# Altium PCB CH32V4x7V-R0.PcbDoc (part 3 of 3)
Units mm, origin at the board's own origin, x right, y up, seen from the top; angles counter-clockwise.
Board outline 106.4 x 69.09 mm, 2 copper layers (Top Layer, Bottom Layer); 78 components, 117 nets, 431 pads, 740 vias.
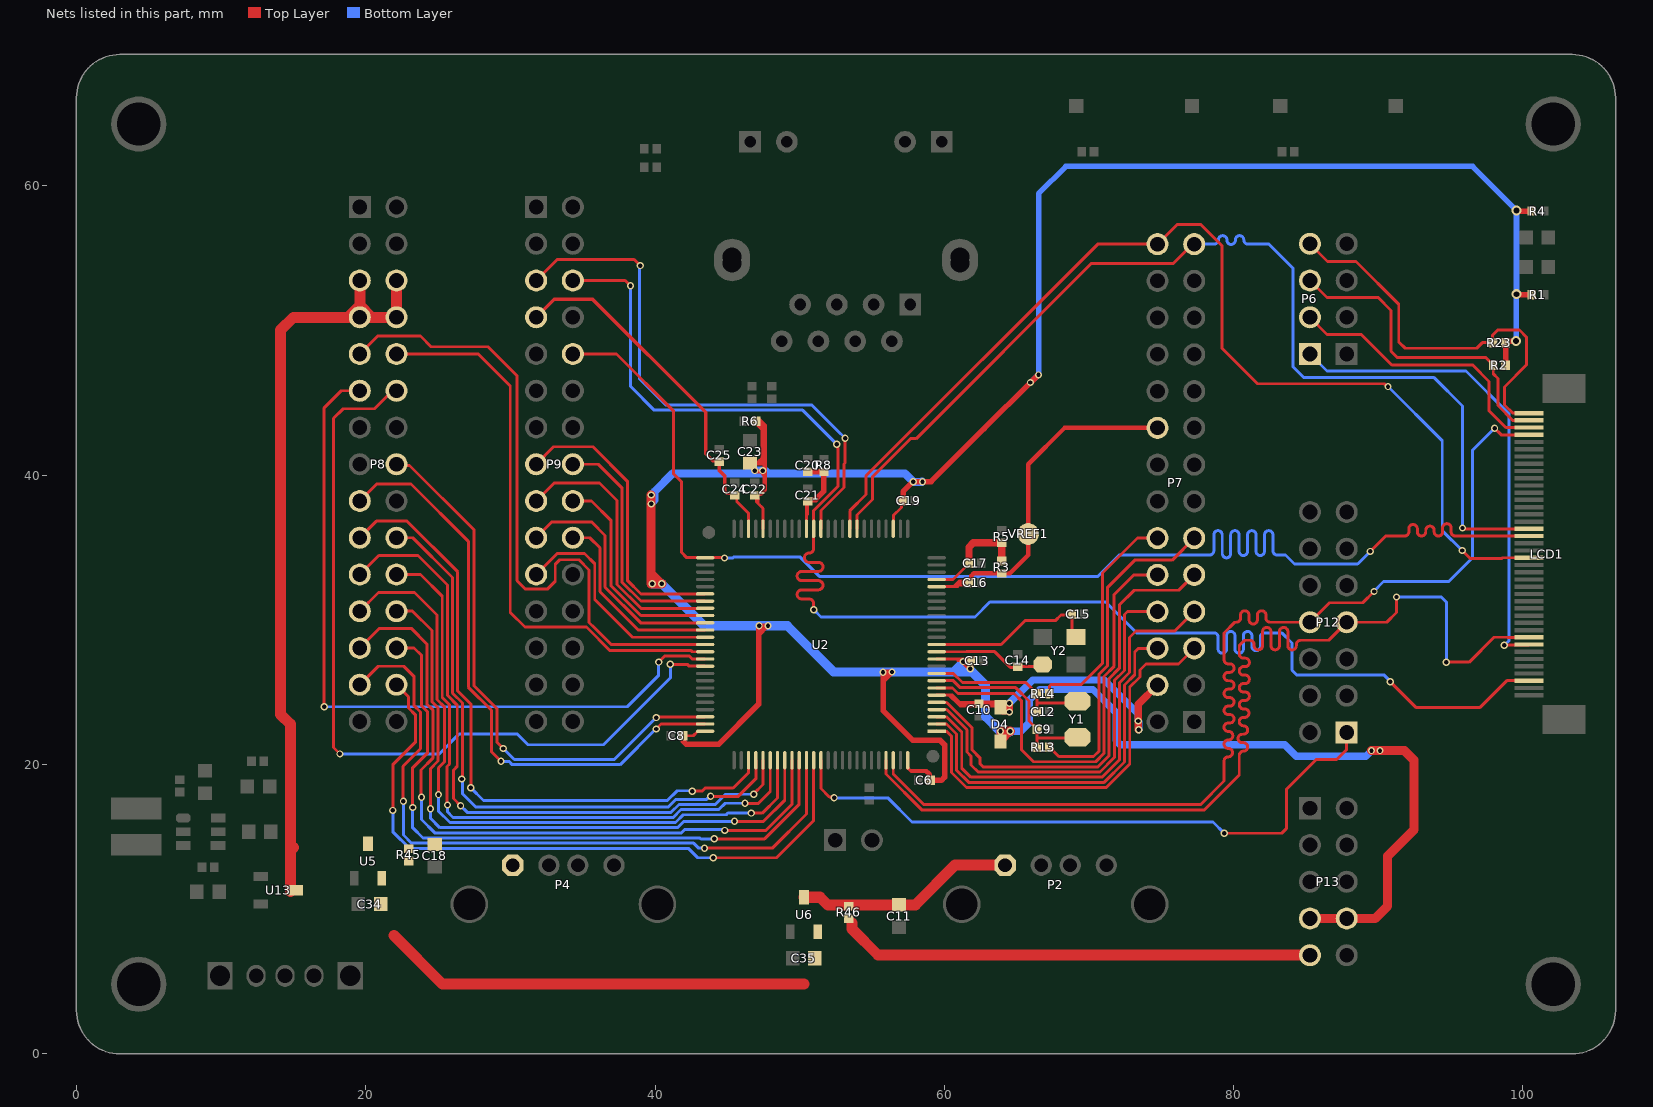
[diagram p3: the nets of this part, all layers, seen from the top]

## Via types
v1: diameter 0.5, hole 0.3, Top Layer to Bottom Layer, tented both sides, 735 vias
v2: diameter 0.7, hole 0.4, Top Layer to Bottom Layer, tented both sides, 5 vias

## Nets (pads, with @x,y where several pads share a name; then routed paths per layer and width w, separated by ;. In a path a pad name is that pad's centre, name@x,y a point inside that pad or via, vN(x,y) a via of type N, cw(c..) or ccw(c..) an arc to the next point about the centre after c; other vN are vias at no path point) (continued)
PC4: LCD1.24 P7.27 U2.33 | length 74.7
  Top Layer w0.203: U2.33@53.964,36.298 53.964,37.248 55.034,38.318 55.034,39.901 57.662,42.529 58.053,42.529 70.173,54.65 75.833,54.65 P7.27@77.319,56.137 ; v1(95.82,36.355) 95.877,36.298 96.082,36.298 96.087,36.293 100.426,36.293 LCD1.24@100.428,36.295
  Bottom Layer w0.203: P7.27@77.272,55.975 78.553,55.975 78.655,55.975 ccw(c78.655,56.267) 78.947,56.267 ; 78.947,56.268 cw(c79.239,56.268) 79.531,56.268 79.531,56.248 ccw(c79.823,56.248) 80.115,56.248 80.115,56.268 cw(c80.408,56.268) 80.7,56.268 ; 80.7,56.267 ccw(c80.992,56.267) 80.992,55.975 81.856,55.975 82.44,55.975 84.101,54.314 84.101,47.501 84.859,46.743 93.863,46.743 95.82,44.786 v1(95.82,36.355)
PC5: LCD1.20 P7.28 U2.34 | length 74.5
  Top Layer w0.203: U2.34@53.464,36.298 53.464,37.543 54.591,38.67 54.591,39.961 70.605,55.975 P7.28@74.732,55.975 74.743,55.975 76.101,57.332 77.723,57.332 79.193,55.863 79.193,48.772 81.64,46.325 90.406,46.325 90.603,46.128 v1(90.674,46.128) ; v1(95.796,34.792) 96.347,34.241 98.554,34.241 98.608,34.295 LCD1.20@100.428,34.295
  Bottom Layer w0.203: v1(90.674,46.128) 94.421,42.382 94.421,36.167 v1(95.796,34.792)
PC6: P8.9 U2.63 | length 46
  Top Layer w0.203: P8.9@19.588,48.38 20.828,49.62 23.776,49.62 24.515,48.881 28.449,48.881 30.452,46.878 30.452,32.713 31.041,32.124 32.554,32.124 33.102,32.672 33.102,33.847 33.411,34.156 34.741,34.156 35.44,33.458 35.44,29.826 35.834,29.432 36.967,28.298 U2.63@43.464,28.298
PC7: P8.10 U2.64 | length 39
  Top Layer w0.203: P8.10@22.128,48.38 27.779,48.38 29.99,46.169 29.99,30.514 31,29.505 35.258,29.505 36.889,27.873 42.495,27.873 42.57,27.798 U2.64@43.464,27.798
PC8: P8.11 U2.65 | length 52
  Top Layer w0.203: v1(17.126,23.989) 17.126,44.66 18.306,45.84 P8.11@19.588,45.84 ; v1(40.251,27.08) 40.689,27.518 42.347,27.518 42.567,27.298 U2.65@43.464,27.298
  Bottom Layer w0.203: v1(17.126,23.989) 17.133,23.996 38.081,23.996 40.251,26.166 v1(40.251,27.08)
PC9: P8.12 U2.66 | length 57.6
  Top Layer w0.203: v1(18.214,20.737) 17.779,21.172 17.779,43.933 18.44,44.595 20.612,44.595 21.857,45.84 P8.12@22.128,45.84 ; v1(41.058,26.93) 42.231,26.93 42.363,26.798 U2.66@43.464,26.798
  Bottom Layer w0.203: v1(18.214,20.737) 25.08,20.737 26.468,22.125 30.464,22.125 31.219,21.37 36.438,21.37 41.058,25.991 v1(41.058,26.93)
PC10: P8.19 U2.78 | length 45.3
  Top Layer w0.203: P8.19@19.588,35.68 20.731,36.822 22.854,36.822 26.355,33.321 26.355,25.078 27.291,24.143 27.291,18.419 v1(27.261,18.389) ; v1(42.578,18.156) 43.236,18.156 43.359,18.279 43.364,18.279 43.458,18.373 45.403,18.373 46.464,19.434 U2.78@46.464,20.298
  Bottom Layer w0.203: v1(27.261,18.389) 28.143,17.507 40.849,17.507 41.53,18.187 42.547,18.187 v1(42.578,18.156)
PC11: P8.20 U2.79 | length 43
  Top Layer w0.203: P8.20@22.128,35.68 23.251,35.68 26,32.931 26,24.931 26.68,24.251 26.68,19.035 v1(26.642,18.997) ; v1(43.839,17.816) 43.85,17.804 45.757,17.804 46.964,19.012 U2.79@46.964,20.298
  Bottom Layer w0.203: v1(26.642,18.997) 26.68,18.959 26.68,17.982 27.586,17.076 40.922,17.076 41.443,17.597 43.572,17.597 43.79,17.816 v1(43.839,17.816)
PC12: P8.21 U2.80 | length 46.9
  Top Layer w0.203: P8.21@19.588,33.14 20.903,34.455 23.607,34.455 25.644,32.418 25.644,24.784 26.324,24.104 26.324,19.875 26.06,19.611 26.06,17.656 v1(26.557,17.159) ; v1(46.826,17.947) 46.826,17.975 47.464,18.614 U2.80@47.464,20.298
  Bottom Layer w0.203: v1(26.557,17.159) 27.016,16.7 41.111,16.7 41.653,17.242 44.163,17.242 44.868,17.947 v1(46.826,17.947)
PC13: P7.10 U2.7 | length 30.7
  Top Layer w0.203: U2.7@59.464,25.298 60.562,25.298 60.945,24.915 64.809,24.915 65.346,24.379 65.346,21 66.153,20.193 70.458,20.193 71.038,20.773 71.038,26.096 71.74,26.797 71.74,31.751 73.104,33.115 P7.10@74.732,33.115
PC14: P7.11 R13.1 | length 22.8
  Top Layer w0.203: R13.1@67.254,21.207 67.254,21.182 67.452,20.983 67.477,20.983 67.912,20.548 70.31,20.548 70.683,20.921 70.683,26.243 71.291,26.851 71.291,32.26 73.161,34.131 75.748,34.131 P7.11@77.272,35.655
PC15: P7.12 R14.1 | length 15.9
  Top Layer w0.203: R14.1@67.254,24.89 67.254,25.401 67.378,25.526 69.463,25.526 70.935,26.998 70.935,33.244 73.346,35.655 P7.12@74.732,35.655
PD0: P8.22 U2.81 | length 44.4
  Top Layer w0.203: P8.22@22.128,33.14 23.781,33.14 25.288,31.632 25.288,24.637 25.786,24.139 25.786,20.026 25.624,19.865 25.624,17.229 v1(25.653,17.2) ; v1(46.213,17.326) 46.234,17.306 47.14,17.306 47.964,18.13 U2.81@47.964,20.298
  Bottom Layer w0.203: v1(25.653,17.2) 25.653,16.732 26.04,16.345 41.259,16.345 41.8,16.886 44.409,16.886 44.849,17.326 v1(46.213,17.326)
PD1: P8.23 U2.82 | length 47.5
  Top Layer w0.203: P8.23@19.588,30.6 20.88,31.892 23.378,31.892 24.933,30.337 24.933,24.489 25.43,23.992 25.43,20.173 25.028,19.771 v1(25.028,17.924) ; v1(46.651,16.642) 46.656,16.638 47.407,16.638 48.464,17.695 U2.82@48.464,20.298
  Bottom Layer w0.203: v1(25.028,17.924) 25.039,17.913 25.039,16.772 25.822,15.989 41.406,15.989 41.948,16.531 44.92,16.531 45.031,16.642 v1(46.651,16.642)
PD2: P8.24 U2.83 | length 44.7
  Top Layer w0.203: P8.24@22.128,30.6 23.235,30.6 24.577,29.258 24.577,24.342 24.99,23.929 24.99,20.236 24.467,19.713 24.467,17.32 24.471,17.316 v1(24.471,16.939) ; v1(45.494,16.074) 47.506,16.074 48.964,17.533 U2.83@48.964,20.298
  Bottom Layer w0.203: v1(24.471,16.939) 24.471,16.283 25.121,15.633 41.553,15.633 41.994,16.074 v1(45.494,16.074)
PD3: P8.25 U2.84 | length 48.2
  Top Layer w0.203: P8.25@19.588,28.06 20.944,29.416 23.147,29.416 24.222,28.341 24.222,24.195 24.635,23.782 24.635,20.44 23.815,19.62 23.815,17.772 v1(23.852,17.735) ; v1(44.814,15.448) 47.658,15.448 49.464,17.254 U2.84@49.464,20.298
  Bottom Layer w0.203: v1(23.852,17.735) 23.852,16.197 24.772,15.278 41.824,15.278 42.05,15.504 44.758,15.504 v1(44.814,15.448)
PD4: P8.26 U2.85 | length 45.5
  Top Layer w0.203: P8.26@22.128,28.06 23.335,28.06 23.866,27.529 23.866,24.047 24.279,23.634 24.279,20.817 23.244,19.782 v1(23.244,17.036) ; v1(44.09,14.867) 47.58,14.867 49.964,17.251 U2.85@49.964,20.298
  Bottom Layer w0.203: v1(23.244,17.036) 23.244,15.631 23.953,14.922 43.106,14.922 43.161,14.867 v1(44.09,14.867)
PD5: P8.27 U2.86 | length 49.2
  Top Layer w0.203: P8.27@19.588,25.52 20.865,26.797 22.626,26.797 23.346,26.076 23.346,24.064 23.783,23.627 23.783,21.096 22.568,19.88 22.568,17.49 v1(22.602,17.455) ; v1(43.414,14.22) 48.104,14.22 50.464,16.58 U2.86@50.464,20.298
  Bottom Layer w0.203: v1(22.602,17.455) 22.602,15.129 23.165,14.567 42.672,14.567 43.018,14.22 v1(43.414,14.22)
PD6: P8.28 U2.87 | length 46.4
  Top Layer w0.203: v1(21.871,16.83) 21.871,19.985 23.428,21.542 23.428,23.447 22.965,23.91 22.965,24.684 P8.28@22.128,25.52 ; v1(44.019,13.555) 48.397,13.555 50.964,16.123 U2.87@50.964,20.298
  Bottom Layer w0.203: v1(21.871,16.83) 21.871,15.356 23.015,14.211 42.296,14.211 42.951,13.555 v1(44.019,13.555)
PD7: P12.1 U2.88 | length 44.8
  Top Layer w0.203: U2.88@51.464,20.298 51.464,18.336 52.048,17.752 52.324,17.752 v1(52.379,17.697) ; v1(79.348,15.251) 83.325,15.251 83.639,15.565 83.639,18.277 85.702,20.341 87.122,20.341 87.813,21.031 P12.1@87.813,22.218
  Bottom Layer w0.203: v1(52.379,17.697) 56.093,17.697 57.755,16.035 78.564,16.035 v1(79.348,15.251)
PD8: LCD1.23 P9.10 U2.51 | length 94.8
  Top Layer w0.203: P9.10@34.32,48.38 37.338,48.38 41.29,44.428 41.29,40.08 41.839,39.531 41.839,34.65 42.186,34.303 43.46,34.303 U2.51@43.464,34.298 44.783,34.298 v1(44.805,34.276) ; v1(89.444,34.734) 90.511,35.8 91.715,35.8 91.817,35.8 ccw(c91.817,36.092) 92.109,36.092 92.109,36.303 cw(c92.401,36.303) 92.693,36.303 92.693,36.092 ccw(c92.985,36.092) 93.277,36.092 93.277,36.191 cw(c93.569,36.191) 93.861,36.191 93.861,36.092 ccw(c94.153,36.092) 94.445,36.092 94.445,36.359 cw(c94.738,36.359) 95.03,36.359 95.03,36.092 ccw(c95.322,36.092) 95.322,35.8 96.026,35.8 100.423,35.8 LCD1.23@100.428,35.795
  Bottom Layer w0.203: v1(44.805,34.276) 45.38,34.276 45.461,34.357 50.009,34.357 51.353,33.014 70.619,33.014 72.092,34.486 78.232,34.486 78.334,34.486 ccw(c78.334,34.778) 78.626,34.778 78.626,35.878 cw(c78.918,35.878) 79.21,35.878 79.21,34.583 ccw(c79.502,34.583) 79.794,34.583 79.794,35.878 cw(c80.086,35.878) 80.378,35.878 80.378,34.743 ccw(c80.671,34.743) 80.963,34.743 80.963,35.878 cw(c81.255,35.878) 81.547,35.878 81.547,34.743 ccw(c81.839,34.743) 82.131,34.743 82.131,35.878 cw(c82.423,35.878) 82.715,35.878 82.715,34.778 ccw(c83.007,34.778) 83.007,34.486 83.586,34.486 84.21,33.862 84.376,33.862 88.573,33.862 v1(89.444,34.734)
PD9: P9.15 U2.56 | length 20.4
  Top Layer w0.203: P9.15@31.78,40.76 32.989,41.968 35.703,41.968 38.084,39.588 38.084,32.739 39.025,31.798 U2.56@43.464,31.798
PD10: P9.16 U2.57 | length 16.9
  Top Layer w0.203: P9.16@34.32,40.76 36.07,40.76 37.728,39.102 37.728,32.592 39.022,31.298 U2.57@43.464,31.298
PD11: P9.17 U2.58 | length 19.2
  Top Layer w0.203: P9.17@31.78,38.22 33.029,39.468 36.152,39.468 37.372,38.248 37.372,32.444 39.019,30.798 U2.58@43.464,30.798
PD12: P9.18 U2.59 | length 15.1
  Top Layer w0.203: P9.18@34.32,38.22 35.614,38.22 36.942,36.892 36.942,32.372 39.016,30.298 U2.59@43.464,30.298
PD13: P9.19 U2.60 | length 17.1
  Top Layer w0.203: P9.19@31.78,35.68 32.859,36.758 35.622,36.758 36.548,35.831 36.548,32.263 39.013,29.798 U2.60@43.464,29.798
PD14: P9.20 U2.61 | length 13.6
  Top Layer w0.203: P9.20@34.32,35.68 35.484,35.68 36.185,34.979 36.185,31.95 38.837,29.298 U2.61@43.464,29.298
PD15: P9.21 U2.62 | length 16.1
  Top Layer w0.203: P9.21@31.78,33.14 33.235,34.594 35.124,34.594 35.829,33.889 35.829,31.418 38.449,28.798 U2.62@43.464,28.798
PE0: LCD1.9 P12.7 U2.97 | length 74.5
  Top Layer w0.203: U2.97@55.964,20.298 55.964,19.346 58.438,16.873 77.979,16.873 80.385,19.279 80.385,19.338 80.385,20.634 cw(c80.677,20.634) 80.677,20.926 ccw(c80.677,21.218) 80.677,21.51 80.594,21.51 cw(c80.594,21.802) 80.594,22.094 80.677,22.094 ccw(c80.677,22.386) 80.677,22.678 cw(c80.677,22.971) 80.677,23.263 80.766,23.263 ccw(c80.766,23.555) 80.766,23.847 80.677,23.847 cw(c80.677,24.139) 80.677,24.431 80.793,24.431 ccw(c80.793,24.723) 80.793,25.015 80.677,25.015 cw(c80.677,25.307) 80.677,25.599 80.793,25.599 ccw(c80.793,25.892) 80.793,26.184 80.677,26.184 cw(c80.677,26.476) 80.677,26.768 80.793,26.768 ccw(c80.793,27.06) 80.793,27.352 80.677,27.352 cw(c80.677,27.644) 80.385,27.644 80.385,27.746 80.385,28.218 80.513,28.345 80.759,28.591 81.118,28.591 cw(c81.118,28.299) 81.41,28.299 81.41,28.22 ccw(c81.702,28.22) 81.994,28.22 81.994,29.19 cw(c82.286,29.19) 82.579,29.19 82.579,28.22 ccw(c82.871,28.22) 83.163,28.22 83.163,29.19 cw(c83.455,29.19) 83.747,29.19 83.747,28.22 ccw(c84.039,28.22) 84.331,28.22 84.331,28.299 cw(c84.623,28.299) 84.623,28.591 84.725,28.591 86.566,28.591 P12.7@87.813,29.838 90.577,29.838 91.255,30.516 v1(91.255,31.58) ; v1(94.693,27.077) 96.279,27.077 98.002,28.8 98.94,28.8 98.945,28.795 LCD1.9@100.428,28.795
  Bottom Layer w0.203: v1(91.255,31.58) 94.357,31.58 94.712,31.225 94.712,27.096 v1(94.693,27.077)
PE1: LCD1.37 P12.8 U2.98 | length 74.5
  Top Layer w0.203: U2.98@56.464,20.298 56.464,19.349 58.585,17.228 77.707,17.228 79.333,18.855 79.333,19.589 79.333,20.243 cw(c79.626,20.243) 79.626,20.535 ccw(c79.626,20.827) 79.626,21.12 cw(c79.626,21.412) 79.626,21.704 79.654,21.704 ccw(c79.654,21.996) 79.654,22.288 79.626,22.288 cw(c79.626,22.58) 79.626,22.872 79.737,22.872 ccw(c79.737,23.164) 79.737,23.456 79.626,23.456 cw(c79.626,23.748) 79.626,24.041 79.737,24.041 ccw(c79.737,24.333) 79.737,24.625 79.626,24.625 cw(c79.626,24.917) 79.626,25.209 79.737,25.209 ccw(c79.737,25.501) 79.737,25.793 79.626,25.793 cw(c79.626,26.085) 79.626,26.377 79.737,26.377 ccw(c79.737,26.669) 79.737,26.962 79.626,26.962 cw(c79.626,27.254) 79.333,27.254 79.333,27.355 79.333,29.09 80.081,29.838 80.183,29.838 ccw(c80.183,30.13) 80.475,30.13 80.475,30.342 cw(c80.767,30.342) 81.059,30.342 81.059,30.007 ccw(c81.351,30.007) 81.643,30.007 81.643,30.342 cw(c81.935,30.342) 82.227,30.342 82.227,30.13 ccw(c82.519,30.13) 82.519,29.838 83.802,29.838 P12.8@85.273,29.838 86.62,31.185 88.927,31.185 v1(89.709,31.967) ; v1(98.037,43.255) 98.496,42.795 LCD1.37@100.428,42.795
  Bottom Layer w0.203: v1@89.696,31.981 90.362,32.647 94.869,32.647 96.513,34.291 96.513,41.731 v1(98.037,43.255)
PE2: P7.5 U2.1 | length 28.3
  Top Layer w0.203: U2.1@59.464,22.311 59.452,22.311 U2.1@59.464,22.298 60.15,22.298 60.49,21.958 60.49,19.457 61.532,18.415 71.194,18.415 72.816,20.037 72.816,25.359 73.518,26.061 73.518,26.535 73.93,26.947 76.185,26.947 P7.5@77.272,28.035
PE3: P7.6 U2.2 | length 26.3
  Top Layer w0.203: U2.2@59.464,22.798 60.153,22.798 60.845,22.105 60.845,19.604 61.68,18.77 71.047,18.77 72.461,20.184 72.461,25.506 73.163,26.208 73.163,27.779 73.418,28.035 P7.6@74.732,28.035
PE4: P7.7 U2.3 | length 30.3
  Top Layer w0.203: U2.3@59.464,23.298 60.155,23.298 61.201,22.253 61.201,19.752 61.827,19.126 70.9,19.126 72.105,20.331 72.105,25.654 72.807,26.355 72.807,28.784 73.253,29.23 75.928,29.23 P7.7@77.272,30.575
PE5: P7.8 U2.4 | length 28.3
  Top Layer w0.203: U2.4@59.464,23.798 60.158,23.798 61.557,22.4 61.557,20.868 61.849,20.575 61.849,19.973 62.341,19.481 70.752,19.481 71.75,20.479 71.75,25.801 72.451,26.503 72.451,30.371 72.655,30.575 P7.8@74.732,30.575
PE6: P7.9 U2.5 | length 32
  Top Layer w0.203: U2.5@59.464,24.298 60.161,24.298 61.912,22.547 61.912,21.015 62.453,20.475 62.453,20.072 62.688,19.837 70.605,19.837 71.394,20.626 71.394,25.948 72.096,26.65 72.096,31.025 73.12,32.049 76.207,32.049 P7.9@77.272,33.115
PE8: P9.5 U2.38 | length 38.7
  Top Layer w0.203: P9.5@31.78,53.46 33.233,54.913 38.555,54.913 v1(38.978,54.49) ; U2.38@51.464,36.298 51.464,37.554 53.065,39.155 53.065,40.782 53.137,40.854 v1(53.137,42.561)
  Bottom Layer w0.203: v1(38.978,54.49) 38.935,54.447 38.935,46.653 40.733,44.855 50.835,44.855 52.84,42.85 52.848,42.85 v1(53.137,42.561)
PE9: LCD1.3 P9.6 U2.39 | length 107.9
  Top Layer w0.203: P9.6@34.32,53.46 37.932,53.46 v1(38.298,53.094) ; v1(50.964,30.704) 50.964,31.023 50.964,31.125 ccw(c50.647,31.125) 50.647,31.442 50.139,31.442 cw(c50.139,31.76) 50.139,32.077 51.291,32.077 ccw(c51.291,32.395) 51.291,32.712 50.139,32.712 cw(c50.139,33.03) 50.139,33.347 51.291,33.347 ccw(c51.291,33.665) 51.291,33.982 50.641,33.982 cw(c50.641,34.3) 50.641,34.617 50.647,34.617 ccw(c50.647,34.935) 50.964,34.935 50.964,35.903 U2.39@50.964,36.298 50.964,37.557 52.646,39.239 52.646,41.869 52.623,41.892 52.623,42.08 v1(52.566,42.137) ; v1(90.824,25.722) 92.591,23.956 97.042,23.956 98.882,25.795 LCD1.3@100.401,25.795
  Bottom Layer w0.203: v1(38.298,53.094) 38.298,46.146 39.945,44.499 50.204,44.499 v1(52.566,42.137) ; v1(50.964,30.704) 51.463,30.205 62.114,30.205 63.144,31.236 71.153,31.236 73.28,29.109 77.943,29.109 78.629,29.109 cw(c78.629,28.816) 78.921,28.816 78.921,27.989 ccw(c79.213,27.989) 79.505,27.989 79.505,28.911 cw(c79.797,28.911) 80.089,28.911 80.089,27.989 ccw(c80.381,27.989) 80.673,27.989 80.673,28.911 cw(c80.965,28.911) 81.258,28.911 81.258,28.166 ccw(c81.55,28.166) 81.842,28.166 81.842,28.816 cw(c82.134,28.816) 82.134,29.109 83.1,29.109 83.32,29.109 84.024,28.404 84.024,26.526 84.346,26.204 90.377,26.204 90.824,25.757 v1(90.824,25.722)
PE10: P8.16 U2.73 | length 38.7
  Top Layer w0.203: P8.16@22.128,40.76 22.209,40.68 23.033,40.68 27.469,36.243 27.469,25.473 29.061,23.881 29.061,21.561 v1(29.513,21.109) ; v1(40.086,23.243) 40.136,23.293 43.46,23.293 U2.73@43.464,23.298
  Bottom Layer w0.203: v1(29.513,21.109) 30.273,20.349 37.186,20.349 40.08,23.243 v1(40.086,23.243)
PE11: P8.17 U2.74 | length 41.1
  Top Layer w0.203: P8.17@19.588,38.22 20.759,39.39 23.135,39.39 27.092,35.433 27.092,25.347 28.691,23.748 28.691,20.884 v1(29.351,20.224) ; v1(40.08,22.459) 40.419,22.798 U2.74@43.464,22.798
  Bottom Layer w0.203: v1(29.351,20.224) 29.895,20.224 30.126,19.994 37.587,19.994 40.052,22.459 v1(40.08,22.459)
TOUCH_INT: LCD1.38 P6.2 | length 19.5
  Top Layer w0.203: P6.2@85.273,50.92 86.459,49.734 88.818,49.734 90.933,47.619 96.528,47.619 97.658,46.489 97.658,44.452 98.814,43.295 LCD1.38@100.428,43.295
TOUCH_RST: LCD1.8 P6.1 | length 33.3
  Top Layer w0.203: v1(98.71,28.245) 98.736,28.27 100.403,28.27 LCD1.8@100.428,28.295
  Bottom Layer w0.203: P6.1@85.273,48.38 86.451,47.202 96.065,47.202 99.046,44.221 99.046,28.581 v1(98.71,28.245)
TOUCH_SCLK: LCD1.39 P6.3 R2.2 | length 22.3
  Top Layer w0.203: P6.3@85.273,53.46 86.455,52.278 89.995,52.278 90.879,51.393 90.879,48.574 91.307,48.146 97.43,48.146 97.942,47.634 97.942,47.016 98.266,46.692 98.266,44.812 99.283,43.795 LCD1.39@100.428,43.795
TOUCH_SDA: LCD1.40 P6.4 R23.2 | length 27.8
  Top Layer w0.203: P6.4@85.273,56 86.488,54.785 88.45,54.785 91.414,51.821 91.414,49.217 91.853,48.777 96.8,48.777 97.188,49.165 97.888,49.165 97.888,49.676 98.255,50.042 99.756,50.042 100.251,49.547 100.251,47.634 98.726,46.108 98.726,44.856 99.286,44.295 LCD1.40@100.428,44.295
VBAT: C10.2 D4.1 P7.4 U2.6 | length 26.2
  Top Layer w0.203: U2.6@59.464,24.798 60.327,24.798 ; C10.2@62.073,24.033 62.068,24.039 61.086,24.039 60.942,24.183 ; C10.2@62.172,24.263 62.155,24.281 61.076,24.281 ; C10.2@62.177,24.033 62.177,24.153 C10.2@62.147,24.183 ; C10.2@62.37,24.183 C10.2@62.147,24.183 ; 60.327,24.798 60.942,24.183 ; 60.327,24.798 60.559,24.798 61.076,24.281 ; 60.942,24.183 61.174,24.183 ; 61.076,24.281 61.174,24.183 ; 61.174,24.183 C10.2@62.147,24.183
  Top Layer w0.508: C10.2@62.37,24.183 63.705,24.183 63.875,24.013 D4.1@63.875,23.953 63.875,23.868 64.036,23.707 64.424,23.707 v1(64.497,23.635) 64.497,24.185 64.036,24.185 63.993,24.142 D4.1@63.993,24.046 ; v1@73.4,22.402 v1(73.4,23.013) 73.4,24.163 P7.4@74.732,25.495
  Bottom Layer w0.508: v1(64.497,23.635) v1(64.497,24.236) 66.105,25.844 71.056,25.844 73.4,23.5 v1(73.4,23.013) 73.436,22.977 v1(73.436,22.402)
VBUS: C34.1 C35.1 P8.5 P8.6 P8.7 P8.8 P13.9 R45.1 R46.1 U5.2 U6.2 U13.3 | length 117.8
  Top Layer w0.762: U13.3@14.783,11.212 14.783,14.025 ; 15.01,14.252 14.783,14.025 ; P8.5@19.588,53.46 19.588,51.735 ; 21.942,8.182 25.311,4.813 50.279,4.813 ; P8.6@22.128,53.46 P8.8@22.128,50.92 20.403,50.92 ; R46.1@53.609,9.062 53.609,8.639 55.429,6.818 P13.9@85.273,6.818 ; 14.783,14.025 14.783,22.805 14.113,23.475 14.113,50.03 15.003,50.92 18.774,50.92 ; 18.774,50.92 19.588,51.735 ; 18.774,50.92 P8.7@19.588,50.92 ; P8.7@19.588,50.92 20.403,50.92 ; P8.7@19.588,50.92 19.588,51.735 ; 19.588,51.735 20.403,50.92
VBUS_P1: C18.1 P4.1 R45.2 U5.3
VBUS_P2: C11.1 P2.1 R46.2 U6.3 | length 15.1
  Top Layer w0.762: U6.3@50.305,10.827 51.4,10.827 51.939,10.287 R46.2@53.397,10.287 ; R46.2@53.495,10.295 C11.1@56.864,10.295 57.987,10.295 60.749,13.056 P2.1@64.117,13.056
VDD: C6.2 C8.1 C13.1 C19.2 C22.2 C23.2 D4.2 P13.7 P13.8 R1.1 R2.1 R4.1 R6.2 R23.1 U2.11 U2.28 U2.46 U2.75 U2.100 | length 246.3
  Top Layer w0.203: C8.1@41.94,21.989 42.635,21.989 42.936,22.29 43.456,22.29 U2.75@43.465,22.298 ; C22.2@46.877,38.594 46.942,38.594 46.963,38.573 47.001,38.535 C22.2@47.009,38.527 ; C22.2@47.009,38.549 C22.2@47.009,38.527 ; 47.259,37.918 47.123,38.054 ; U2.46@47.464,36.298 47.464,37.712 47.123,38.054 ; U2.28@56.464,36.298 56.469,36.303 56.469,37.21 57.031,37.772 57.031,38.257 C19.2@57.148,38.373 ; 58.753,19.468 58.869,19.352 58.869,19.079 C6.2@59.036,18.912 59.036,19.361 58.882,19.516 ; U2.11@59.464,27.298 60.842,27.298 ; v1@61.256,27.123 61.206,27.173 60.967,27.173 60.842,27.298 ; C13.1@61.852,27.168 61.722,27.298 60.842,27.298 ; C22.2@47.009,38.527 47.123,38.413 47.123,38.054 ; C22.2@47.009,38.527 47.009,38.168 47.123,38.054 ; U2.100@57.469,19.772 57.469,20.293 U2.100@57.464,20.298 57.464,19.777 U2.100@57.469,19.772 ; U2.100@57.469,19.772 57.469,19.745 57.623,19.591 ; U2.100@57.469,19.772 57.65,19.591 ; 57.623,19.591 57.65,19.591 ; 57.623,19.591 57.699,19.516 58.882,19.516 ; 57.65,19.591 58.806,19.591 58.882,19.516
  Top Layer w0.305: C22.2@46.95,38.56 47.098,38.708 47.304,38.708 47.58,38.984 47.58,40.005 ; C23.2@46.95,40.823 47.54,40.823 47.58,40.782 ; C22.2@47.001,38.535 C22.2@47.009,38.527 ; R6.2@47.001,43.727 47.001,43.702 47.58,43.123 ; v1@47.013,40.26 47.325,40.26 47.58,40.005 ; R6.2@47.052,43.549 47.43,43.17 ; R6.2@47.166,43.852 47.58,43.437 47.58,43.123 ; 47.211,40.94 47.43,41.159 47.43,43.17 ; 47.23,40.921 47.431,40.921 47.58,41.07 ; 47.43,43.17 47.58,43.02 ; 47.58,40.005 47.58,40.782 ; 47.58,40.782 47.58,41.07 ; 47.58,41.07 47.58,43.02 ; 47.58,43.02 47.58,43.123
  Top Layer w0.381: C8.1@41.94,21.989 41.94,21.619 42.161,21.398 44.396,21.398 47.169,24.171 47.169,29.041 ; v1@47.169,29.48 47.169,29.041 ; v1@47.291,29.551 47.306,29.566 47.784,29.566 v1(47.807,29.589) ; v1@47.656,29.528 47.169,29.041 ; v1(56.376,26.393) v1@56.369,26.387 ; C19.2@57.148,38.373 57.152,38.373 57.152,38.863 v1(57.844,39.555) 59.091,39.555 62.753,43.217 v1(65.949,46.413) 65.952,46.416 65.972,46.416 66.492,46.936 v1(66.511,46.936) ; C6.2@59.036,18.912 59.797,18.912 60.02,19.135 60.02,21.368 59.716,21.672 57.817,21.672 55.759,23.73 55.759,25.777 ; v1@61.326,27.189 61.326,27.095 v1(61.797,26.623) 61.82,26.646 C13.1@61.82,27.135 ; v1@61.481,27.133 61.818,27.133 C13.1@61.82,27.135 ; C13.1@61.852,27.168 C13.1@61.82,27.135 ; R23.1@98.789,49.127 98.792,49.124 R2.1@98.792,47.609 ; R23.1@98.792,49.17 98.898,49.276 v2@99.493,49.276 ; v2(99.545,52.518) 99.578,52.518 99.618,52.477 R1.1@100.613,52.477 ; v2(99.557,58.304) 99.59,58.304 99.631,58.262 100.503,58.262 100.506,58.264 R4.1@100.613,58.264 ; 55.759,25.777 v1@56.369,26.387 ; 55.759,25.777 v1(55.759,26.38) 55.766,26.387 v1@56.369,26.387
  Top Layer w0.635: v1@39.73,32.504 39.73,33.19 ; v1(39.73,38.634) v1(39.73,38.02) 39.73,33.19 ; v1@39.731,32.503 v1(39.808,32.503) v1(40.467,32.503) ; v1@40.382,32.539 39.73,33.19 ; D4.2@63.875,21.593 63.928,21.593 D4.2@63.928,21.731 ; D4.2@63.898,21.711 63.908,21.711 D4.2@63.928,21.731 ; v1(64.558,22.299) v1@64.496,22.299 ; P13.7@85.273,9.358 P13.8@87.813,9.358 89.776,9.358 90.642,10.224 90.642,13.675 92.461,15.495 92.461,20.309 91.808,20.963 v1(90.119,20.963) v1(89.528,20.963) ; D4.2@63.928,21.731 v1@64.496,22.299 ; D4.2@63.928,21.731 63.928,22.299 v1@64.496,22.299
  Bottom Layer w0.381: v1(65.949,46.413) 65.968,46.413 66.492,46.936 v1(66.511,46.936) ; v1@66.522,46.946 66.522,59.469 68.399,61.346 96.515,61.346 v2(99.557,58.304) 99.551,58.298 99.551,52.524 v2(99.545,52.518) 99.535,52.508 99.535,49.261 v2@99.548,49.247
  Bottom Layer w0.508: v1(64.558,22.299) 65.299,22.299 65.877,22.878 65.877,24.464 66.597,25.184 70.274,25.184 71.871,23.587 71.871,21.668 72.169,21.371 83.532,21.371 84.323,20.58 89.145,20.58 v1(89.528,20.963) v1(90.119,20.963)
  Bottom Layer w0.559: v1(39.73,38.02) v1@39.73,38.053 ; v1@58.466,39.555 58.457,39.546 57.853,39.546 v1(57.844,39.555) 57.284,40.115 47.811,40.115 ; v1@39.73,38.053 39.975,38.298 39.975,38.879 ; v1@39.73,38.053 v1(39.73,38.634) 39.975,38.879 ; 39.975,38.879 41.211,40.115 46.285,40.115 ; 46.285,40.115 47.811,40.115 ; 46.285,40.115 46.489,40.318 v1(46.894,40.318) v1(47.448,40.318) 47.608,40.318 47.811,40.115
  Bottom Layer w0.635: v1@39.831,32.484 39.85,32.503 v1(40.467,32.503) ; v1@40.468,32.505 43.384,29.589 v1(47.195,29.589) v1(47.807,29.589) 49.147,29.589 52.343,26.393 v1(56.376,26.393) 60.642,26.393 ; v1@61.268,27.055 v1@61.268,27.046 ; v1@63.84,22.319 62.85,23.31 62.85,25.465 61.921,26.393 ; v1(63.881,22.299) 63.925,22.256 v1@64.523,22.256 ; 60.642,26.393 60.932,26.393 ; 60.642,26.393 61.268,27.02 v1@61.268,27.046 ; 60.932,26.393 61.921,26.393 ; 60.932,26.393 61.3,26.762 v1@61.3,27.014 ; v1@61.268,27.046 v1@61.3,27.014 ; v1@61.3,27.014 61.921,26.393
  other v1: 61.3,27.117 58.493,39.546
  other v2: 99.525,49.276
VDD18: C24.2 C25.2 P9.7 U2.48 | length 25.3
  Top Layer w0.203: C24.2@45.533,38.606 C24.2@45.648,38.491 ; C24.2@45.614,38.465 C24.2@45.648,38.491 ; U2.48@46.464,36.298 46.464,37.376 45.648,38.193 C24.2@45.648,38.491
  Top Layer w0.254: P9.7@31.678,50.861 31.722,50.861 P9.7@31.78,50.92 33.027,52.167 35.682,52.167 43.5,44.349 43.5,41.488 43.914,41.074 43.932,41.074 ; 43.994,40.994 C25.2@44.441,40.994 ; C25.2@44.466,40.945 C25.2@44.441,40.945 44.441,40.333 44.822,39.952 44.822,38.921 44.999,38.744 45.348,38.744 C24.2@45.503,38.588
VDDA: C17.1 R3.1 R5.2 U2.22 | length 7.5
  Top Layer w0.203: U2.22@59.464,32.798 60.604,32.798 C17.1@61.702,33.896
  Top Layer w0.508: C17.1@61.702,33.896 C17.1@61.702,33.921 61.702,35.031 61.999,35.328 R5.2@63.961,35.328 R3.1@63.961,34.065
VDDK: C20.2 C21.2 R8.1 U2.40 | length 6.8
  Top Layer w0.203: U2.40@50.464,36.298 50.464,37.226 ; C21.2@50.528,38.099 50.464,38.035 50.464,37.226 ; C21.2@50.564,38.141 50.552,38.129 50.552,37.313 50.464,37.226
  Top Layer w0.381: C21.2@50.528,38.099 50.528,38.158 50.687,38.318 51.096,38.318 51.676,38.897 R8.1@51.676,40.249 ; C20.2@50.528,40.249 R8.1@51.651,40.249
VREF+: C16.1 P7.18 R3.2 U2.21 VREF1.1 | length 25.1
  Top Layer w0.203: U2.21@59.464,32.298 60.64,32.298 ; C16.1@61.442,32.42 61.012,32.42 60.891,32.298 60.64,32.298 ; C16.1@61.58,32.703 61.575,32.698 61.041,32.698 60.923,32.581 ; C16.1@61.702,32.581 60.923,32.581 ; 60.64,32.298 60.923,32.581
  Top Layer w0.3: C16.1@61.702,32.581 61.852,32.731 61.852,33.043 62.027,33.218 R3.2@63.958,33.218 ; R3.2@64.045,33.228 64.541,33.228 65.796,34.482 VREF1.1@65.796,35.938 65.796,40.765 68.305,43.275 P7.18@74.732,43.275
X32KI: C9.2 R13.2 U2.8 Y1.1 | length 13.2
  Top Layer w0.203: U2.8@59.464,25.798 60.617,25.798 61.098,25.316 64.928,25.316 65.85,24.394 65.85,23.013 66.404,22.459 C9.2@66.404,22.434 66.404,21.821 ; R13.2@66.404,21.207 66.404,21.821 ; Y1.1@69.199,21.888 68.54,21.888 68.472,21.821 66.404,21.821
X32KO: C12.2 R14.2 U2.9 Y1.2 | length 11.7
  Top Layer w0.203: U2.9@59.464,26.298 60.619,26.298 61.245,25.672 65.622,25.672 R14.2@66.404,24.89 66.404,24.248 ; C12.2@66.404,23.662 66.404,24.248 ; C12.2@66.457,23.73 C12.2@66.586,23.859 ; Y1.2@68.472,24.417 68.304,24.248 ; Y1.2@68.964,24.248 68.304,24.248 ; 66.404,24.248 68.304,24.248
XI: C14.2 U2.12 Y2.1 | length 7.8
  Top Layer w0.203: U2.12@59.464,27.798 61.515,27.798 61.52,27.802 63.478,27.802 64.56,26.719 65.046,26.719 C14.2@65.071,26.694 ; C14.2@65.071,26.771 66.704,26.771 Y2.1@66.799,26.866
XO: C15.2 U2.13 Y2.3 | length 11.8
  Top Layer w0.203: U2.13@59.464,28.298 63.928,28.298 65.574,29.945 67.67,29.945 68.064,30.339 C15.2@68.671,30.339 ; C15.2@68.813,30.403 68.813,29.052 Y2.3@69.099,28.766
pads on no net: ?.0 LCD1.0 P10. P10.7 S1.0 S1.3 U1.1 U2.0

## Polygon pours and split planes (outlines as drawn)
GND on Top Layer "GND" (solid, remove dead copper, pour order 0): 0,3 0,66.09 cw(c3,66.09) 3,69.09 103.4,69.09 cw(c103.4,66.09) 106.4,66.09 106.4,3 cw(c103.4,3) 103.4,0 3,0 cw(c3,3)
GND on Bottom Layer "GND" (solid, remove dead copper, pour order 1): 0,3 0,66.09 cw(c3,66.09) 3,69.09 103.4,69.09 cw(c103.4,66.09) 106.4,66.09 106.4,3 cw(c103.4,3) 103.4,0 3,0 cw(c3,3)

## Keep-outs
Keep-Out Layer:
  the board outline again, w0.254

## Other copper
Top Layer:
  rectangle net GND: 6.337,17.125 9.739,18.303
  rectangle net VDD: 46.64,40.13 47.592,41.082
  region net NetL1_1: 7.779,14.671 3.29,14.671 3.188,14.569 3.188,13.819 3.709,13.298 7.441,13.298 7.851,13.709 7.851,14.649
  region net VBUS_P1: 19.628,13.95 22.204,13.95 23.715,13.95 27.745,13.95 28.746,12.949 28.746,12.178 28.888,12.035 30.462,12.035 30.472,12.025 30.868,12.421 30.868,14.705 30.076,15.497 19.799,15.497 19.564,15.262 19.564,14.046
  region net VBUS_P2: 49.931,10.309 51.098,10.309 51.584,9.824 58.402,9.824 60.81,12.232 64.539,12.232 64.803,12.496 64.803,13.498 64.522,13.779 63.011,13.779 62.738,13.507 60.225,13.507 57.69,10.972 51.927,10.972 51.446,11.453 49.897,11.453 49.849,11.404 49.849,10.351
  region net VBUS: 19.67,7.836 19.67,9.134 19.833,9.296 21.393,9.296 25.384,5.305 50.278,5.305 50.6,5.627 50.6,9.264 50.895,9.56 53.915,9.56 54.076,9.398 54.076,8.513 53.794,8.231 52.157,8.231 52.036,8.11 52.036,3.678 51.793,3.434 24.968,3.434 20.567,7.836
  region net VBUS: 15.568,22.557 14.845,23.28 14.429,23.28 14.393,23.244 14.393,10.573 17.131,7.836 22.21,7.836 22.46,8.085 22.46,12.234 22.659,12.433 23.11,12.433 23.288,12.611 23.288,13.479 23.234,13.534 21.06,13.534 20.655,13.128 20.655,9.633 20.318,9.296 17.97,9.296 15.568,11.698 15.568,15.131
  region net +5V: 13.136,4.92 13.136,8.146 12.665,8.617 10.985,8.617 10.535,9.067 10.535,14.552 10.427,14.66 9.377,14.66 9.269,14.552 9.269,7.708 9.828,7.149 11.469,7.149 11.724,6.894 11.724,4.827 11.82,4.732 13.041,4.732
  region net NetS1_1: 12.258,9.974 12.258,10.76 12.387,10.889 13.788,10.889 13.792,10.893 13.792,10.131 15.106,8.818 15.106,4.724 15.016,4.635 13.912,4.635 13.599,4.948 13.599,8.632
  pour cut-out: 2.189,17.477 2.189,13.943 6.111,13.943 6.111,17.448
  region net 1V2: 3.039,16.347 4.993,16.347 5.18,16.534 5.18,18.414 5.428,18.663 7.447,18.663 7.838,19.054 10.627,19.054 10.775,19.201 10.775,20.07 10.397,20.447 4.465,20.447 3.039,19.021

## Silkscreen, mask and mechanical layers (free items; w line width, h text height)
Top Overlay:
  lines w0.152: 63.255,16.875 63.626,16.875 63.626,20.906 65.597,20.906 ; 25.634,26.538 25.634,27.923 25.634,29.402 30.247,29.402 30.247,26.538 25.634,26.538 ; 25.721,49.39 30.245,49.39 30.245,52.198 25.721,52.198 25.721,50.728 25.721,49.39 ; 36.068,26.538 36.068,29.402 40.609,29.402 40.609,26.538 36.068,26.538
  text "CH32V4x7V-R0-1v3" at 11.776,65.758 h1.02
  text "3V3" at 15.364,58.097 h0.89
  text "3V3" at 23.7,58.097 h0.89
  text "ELED1" at 26.478,58.086 h0.89
  text "ELED0" at 35.939,58.086 h0.89
  text "3V3" at 15.364,55.557 h0.89
  text "PB0" at 27.747,55.567 h0.89
  text "PB1" at 36.137,55.567 h0.89
  text "3V3" at 23.7,55.552 h0.89
  text "PC5" at 70.624,55.525 h0.89
  text "PC4" at 78.852,55.525 h0.89
  text "GND" at 89.617,55.488 h0.89
  text "SDA" at 81.215,54.956 h0.89
  text "PE8" at 27.747,53.02 h0.89
  text "PE9" at 36.137,53.02 h0.89
  text "VBUS" at 23.523,53.007 h0.89
  text "PA7" at 70.624,52.989 h0.89
  text "PA6" at 78.852,52.989 h0.89
  text "VBUS" at 14.433,52.845 h0.89
  text "KEY" at 89.44,52.734 h0.89
  text "VBUS" at 23.761,52.706 h0.89 r270
  text "SCLK" at 80.473,51.747 h0.89
  text "PE7/" at 26.747,51.012 h0.89
  text "PB10" at 36.137,50.474 h0.89
  text "PA5" at 70.624,50.453 h0.89
  text "PA4" at 78.852,50.453 h0.89
  text "VBUS" at 14.375,50.3 h0.89
  text "LED2" at 89.44,50.169 h0.89
  text "VDD18" at 26.029,49.689 h0.89
  text "INT" at 81.307,49.595 h0.89
  text "PC6" at 15.364,47.92 h0.89
  text "PC7" at 23.7,47.916 h0.89
  text "PB11" at 27.303,47.927 h0.89
  text "PD8" at 36.137,47.927 h0.89
  text "PA3" at 70.624,47.917 h0.89
  text "PA2" at 78.852,47.917 h0.89
  text "LED1" at 89.44,47.604 h0.89
  text "RST" at 81.382,47.48 h0.89
  text "PC8" at 15.364,45.374 h0.89
  text "PC9" at 23.7,45.37 h0.89
  text "PB12" at 27.007,45.381 h0.89
  text "PB13" at 36.137,45.381 h0.89
  text "PA1" at 70.92,45.381 h0.89
  text "PA0" at 78.852,45.381 h0.89
  text "PB14" at 27.007,42.834 h0.89
  text "PB15" at 36.137,42.834 h0.89
  text "VREF+" at 68.847,42.844 h0.89
  text "PC3" at 78.852,42.844 h0.89
  text "PA8" at 15.364,42.828 h0.89
  text "PA9" at 23.7,42.825 h0.89
  text "PC2" at 70.624,40.308 h0.89
  text "PC1" at 78.852,40.308 h0.89
  text "PA10" at 14.623,40.282 h0.89
  text "PE10" at 23.7,40.279 h0.89
  text "PD9" at 27.747,40.287 h0.89
  text "PD10" at 36.137,40.287 h0.89
  text "PE11" at 14.423,37.812 h0.89
  text "NRST" at 78.852,37.823 h0.89
  text "PC0" at 70.624,37.772 h0.89
  text "PA15" at 23.7,37.734 h0.89
  text "PD11" at 27.303,37.741 h0.89
  text "PD12" at 36.137,37.741 h0.89
  text "GND" at 81.425,37.016 h0.89
  text "GND" at 89.661,37.016 h0.89
  text "PC14" at 78.852,35.287 h0.89
  text "PC15" at 69.883,35.236 h0.89
  text "PC11" at 23.7,35.188 h0.89
  text "PD13" at 27.083,35.194 h0.89
  text "PD14" at 36.137,35.194 h0.89
  text "PC10" at 14.623,35.185 h0.89
  text "GND" at 89.661,34.478 h0.89
  text "GND" at 81.425,34.253 h0.89
  text "PE6" at 78.852,32.75 h0.89
  text "PC13" at 69.883,32.7 h0.89
  text "PD15" at 27.007,32.647 h0.89
  text "3V3" at 36.137,32.647 h0.89
  text "PC12" at 14.623,32.639 h0.89
  text "PD0" at 23.7,32.643 h0.89
  text "GND" at 89.661,31.939 h0.89
  text "GND" at 81.425,31.731 h0.89
  text "PE5" at 70.624,30.164 h0.89
  text "PE4" at 78.852,30.164 h0.89
  text "PD1" at 15.66,30.093 h0.89
  text "PD2" at 23.7,30.097 h0.89
  text "3V3" at 27.747,30.101 h0.89
  text "3V3" at 36.137,30.101 h0.89
  text "PE0" at 89.661,29.4 h0.89
  text "PE1" at 81.721,29.335 h0.89
  text "PD4" at 23.83,29.04 h0.89 r270
  text "PE12/" at 25.898,28.13 h0.89
  text "PB2/" at 36.233,27.952 h0.89
  text "PE3" at 70.624,27.627 h0.89
  text "PE2" at 78.852,27.627 h0.89
  text "PD3" at 15.364,27.547 h0.89
  text "BOOT0" at 25.898,26.868 h0.89
  text "PB8" at 89.661,26.862 h0.89
  text "PB9" at 81.425,26.813 h0.89
  text "BOOT1" at 36.233,26.69 h0.89
  text "VBAT" at 70.1,25.238 h0.89
  text "3V3" at 78.852,25.091 h0.89
  text "PD5" at 15.364,25.001 h0.89
  text "PD6" at 23.7,25.006 h0.89
  text "GND" at 27.747,25.008 h0.89
  text "GND" at 36.137,25.008 h0.89
  text "PB4" at 89.661,24.324 h0.89
  text "PB5" at 81.425,24.308 h0.89
  text "PA11" at 27.303,22.548 h0.89
  text "PA12" at 36.337,22.548 h0.89
  text "5V" at 71.513,22.555 h0.89
  text "5V" at 78.852,22.555 h0.89
  text "GND" at 15.364,22.461 h0.89
  text "GND" at 23.7,22.461 h0.89
  text "PB3" at 81.425,21.786 h0.89
  text "PD7" at 89.661,21.786 h0.89
  text "PA14/SWCLK" at 74.876,16.392 h0.89
  text "TXD" at 89.745,16.385 h0.89
  text "USBHS1" at 29.532,15.64 h2.03
  text "USBHS2" at 63.892,15.626 h2.03
  text "PA13/SWDIO" at 74.876,13.831 h0.89
  text "RXD" at 89.745,13.831 h0.89
  text "PB6" at 50.978,11.952 h0.89
  text "PB7" at 54.161,11.952 h0.89
  text "GND" at 80.938,11.277 h0.89
  text "GND" at 89.745,11.277 h0.89
  text "VDD" at 80.938,8.724 h0.89
  text "VDD" at 89.745,8.724 h0.89
  text "VBUS" at 80.049,6.17 h0.89
  text "5V" at 89.745,6.17 h0.89
  text "ON" at 11.522,1.121 h0.89
  text "OFF" at 15.207,1.121 h0.89
Bottom Overlay:
  drawing of 285 lines, arcs and shapes, not listed
Mechanical 1:
  the board outline again, w0.254

## Text inside footprints (layer, text, board x,y; h text height)
D1: Top Overlay "+" at 102.725,54.671 h1.02 r270
D2: Top Overlay "+" at 102.725,56.717 h1.02 r270
D3: Top Overlay "+" at 10.843,18.213 h1.02 r90
P2: Top Overlay "G" at 70.802,9.991 h1.02; Top Overlay "V" at 63.69,9.991 h1.02; Top Overlay "D+" at 68.008,9.991 h1.02; Top Overlay "D-" at 65.722,9.991 h1.02
P4: Top Overlay "D-" at 31.686,9.991 h1.02; Top Overlay "D+" at 33.972,9.991 h1.02; Top Overlay "V" at 29.654,9.991 h1.02; Top Overlay "G" at 36.766,9.991 h1.02